# Altium PCB IoT_1062.PcbDoc (part 3 of 3)
Units mm, origin at the board's own origin, x right, y up, seen from the top; angles counter-clockwise.
Board outline 174.13 x 100.2 mm, 2 copper layers (Top Layer, Bottom Layer); 191 components, 138 nets, 1095 pads, 196 vias.
Unrouted connection lines stored in the file: 289.
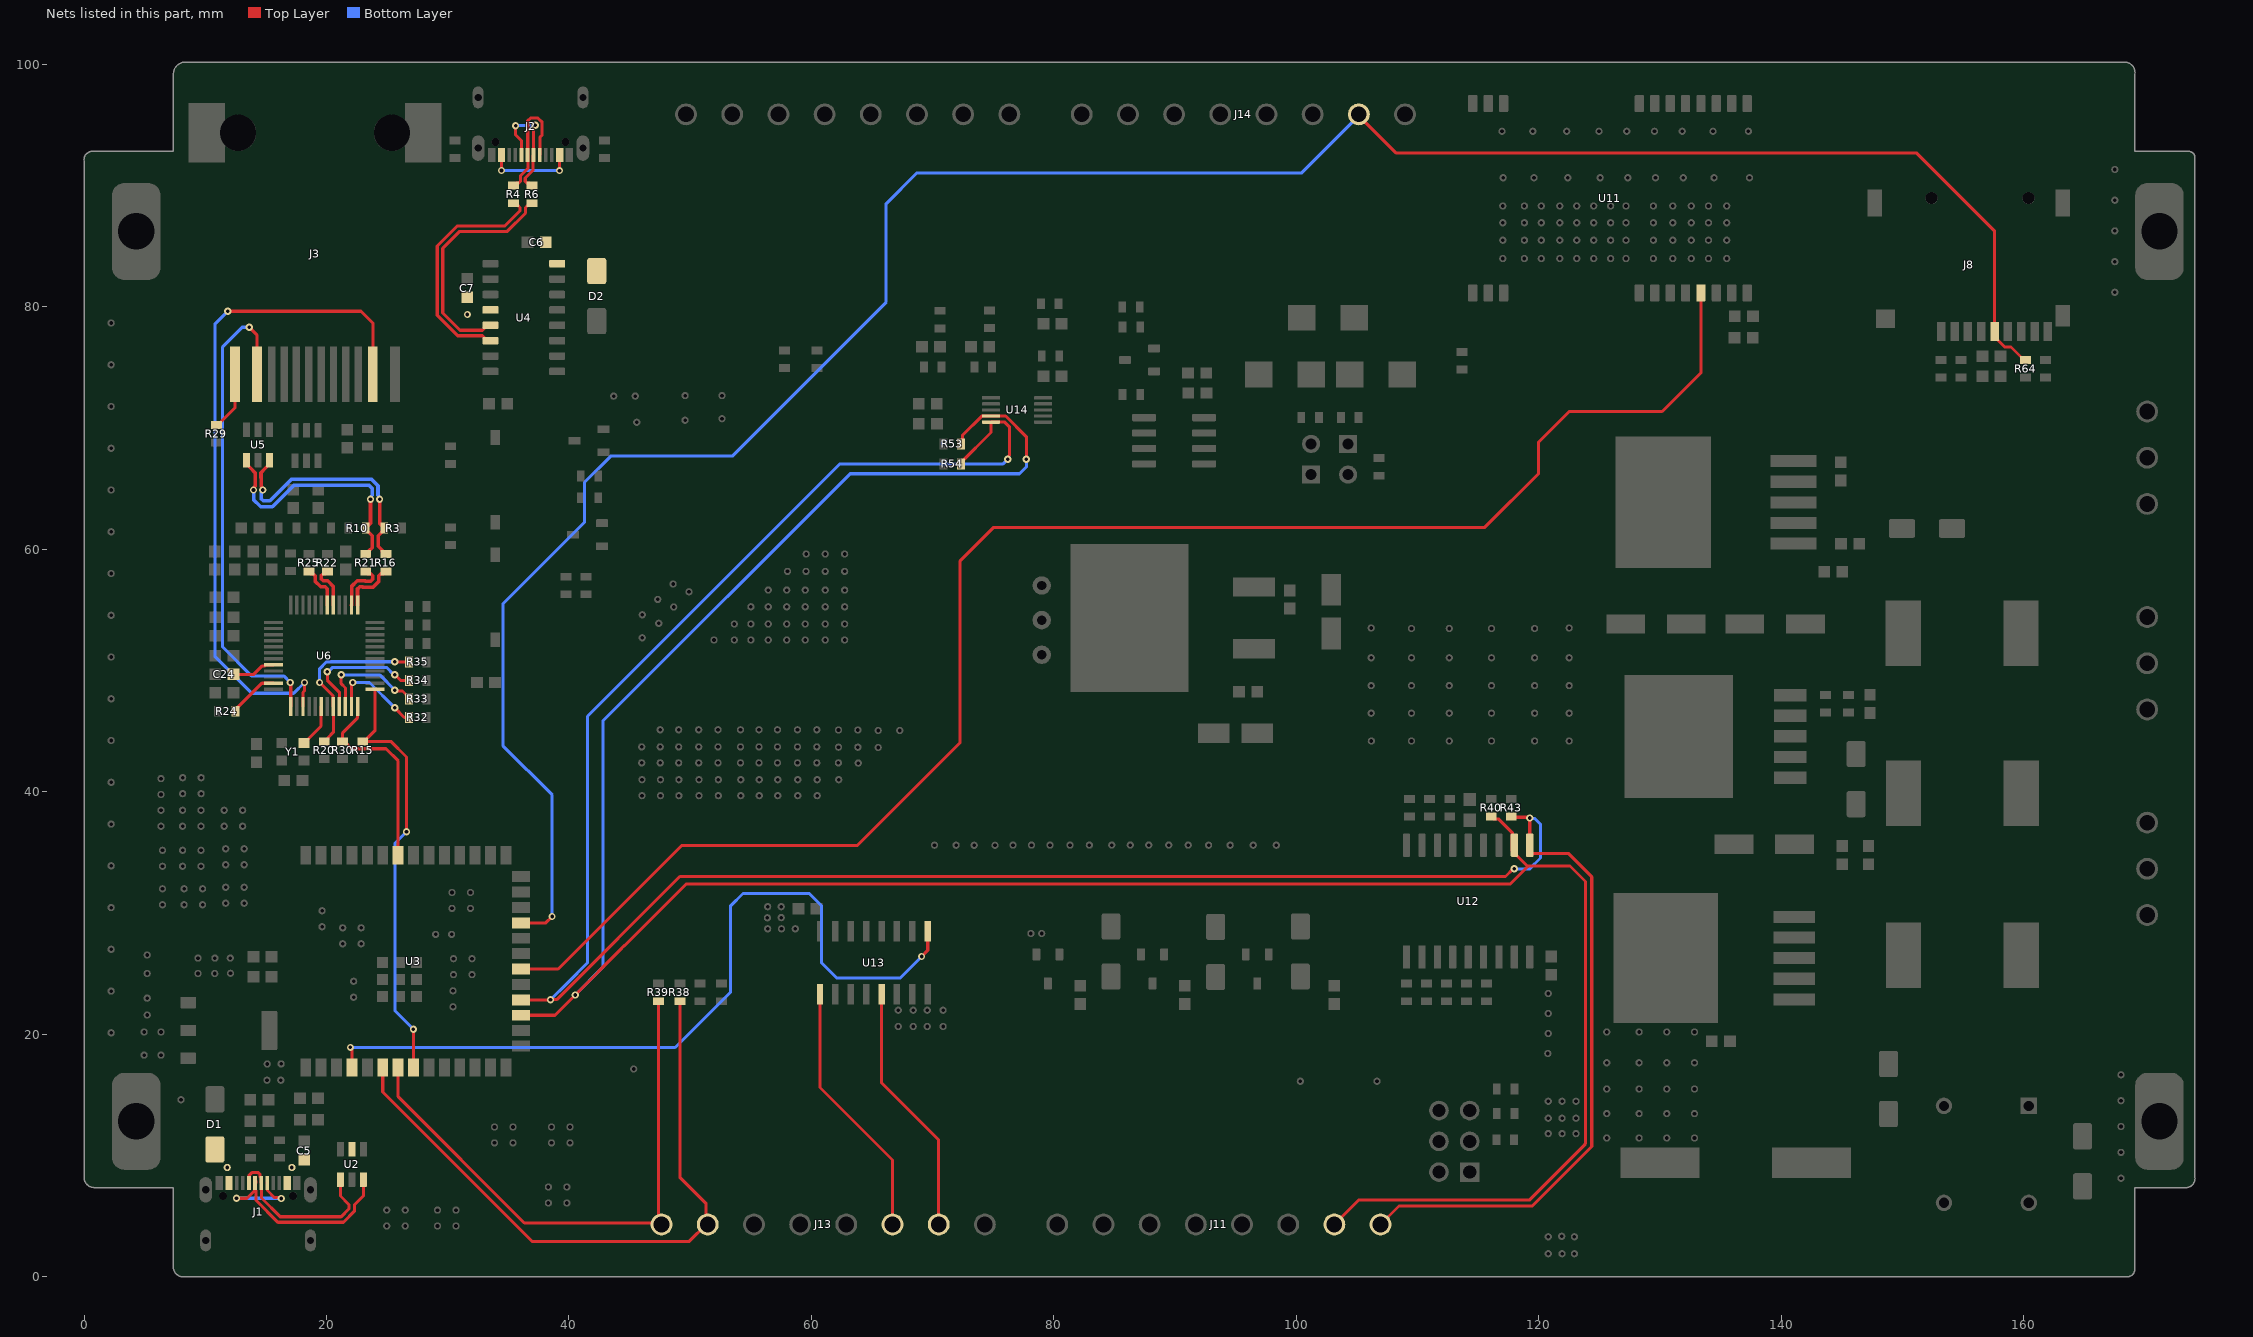
[diagram p3: the nets of this part, all layers, seen from the top]

## Via types
v1: diameter 0.6, hole 0.3, Top Layer to Bottom Layer, tented both sides, 195 vias
v2: diameter 1.524, hole 0.762, Top Layer to Bottom Layer, tented both sides, 1 vias

## Nets (pads, with @x,y where several pads share a name; then routed paths per layer and width w, separated by ;. In a path a pad name is that pad's centre, name@x,y a point inside that pad or via, vN(x,y) a via of type N, cw(c..) or ccw(c..) an arc to the next point about the centre after c; other vN are vias at no path point) (continued)
S1: U3.4 U13.9 | length 66.9
  Top Layer w0.254: v1(21.971,18.923) 21.971,18.829 22.098,18.702 U3.4@22.098,17.272 ; v1(69.088,26.416) 69.596,26.924 U13.9@69.596,28.499
  Bottom Layer w0.254: v1(21.971,18.923) 21.981,18.913 48.758,18.913 53.34,23.495 53.34,30.607 54.356,31.623 59.817,31.623 60.833,30.607 60.833,25.908 62.103,24.638 67.31,24.638 v1(69.088,26.416)
SCK_CD: J8.5 J14.7 R64.2 U3.23 | length 192.7
  Top Layer w0.254: U3.23@36.048,29.197 38.087,29.197 v1(38.608,29.718) ; J14.7@105.156,95.758 108.204,92.71 151.13,92.71 157.598,86.242 J8.5@157.598,77.975 157.598,77.525 158.426,76.697 158.943,76.697 160.022,75.618 R64.2@160.147,75.618
  Bottom Layer w0.254: v1(38.608,29.718) 38.608,39.751 34.544,43.815 34.544,55.499 41.275,62.23 41.275,65.532 43.434,67.691 53.467,67.691 66.167,80.391 66.167,88.519 68.707,91.059 100.457,91.059 J14.7@105.156,95.758
SCL1: J13.8 R39.1 U3.7 | length 46.7
  Top Layer w0.254: U3.7@25.908,17.272 25.908,14.859 36.322,4.445 J13.8@47.384,4.445 ; R39.1@47.371,22.733 47.371,4.458 J13.8@47.384,4.445 ; J13.8@47.511,4.318 J13.8@47.384,4.445
SCL2: J11.1 R43.1 R54.1 U3.18 U12.1 U14.10 | length 222.4
  Top Layer w0.254: U3.18@36.048,22.847 v1@38.468,22.847 ; v1(38.481,22.86) 38.989,22.86 49.149,33.02 117.254,33.02 117.889,33.655 v1(117.983,33.655) ; R54.1@72.353,67.056 72.353,67.181 74.812,69.64 U14.10@74.812,70.501 75.946,70.501 76.327,70.12 76.327,67.759 76.266,67.698 76.266,67.503 v1(76.2,67.437) ; J11.1@106.947,4.318 108.471,5.842 119.463,5.842 124.364,10.742 124.364,32.989 122.428,34.925 119.426,34.925 119.253,35.098 U12.1@119.253,35.598 v1(119.253,37.846) 119.189,37.91 117.792,37.91 R43.1@117.729,37.973
  Bottom Layer w0.254: v1(38.481,22.86) 39.848,24.227 41.529,25.908 41.529,46.228 62.357,67.056 75.819,67.056 v1(76.2,67.437) ; v1(117.983,33.655) 119.253,33.655 120.142,34.544 120.142,37.338 119.671,37.809 119.29,37.809 v1(119.253,37.846)
SDA1: J13.7 R38.1 U3.6 | length 53.7
  Top Layer w0.254: U3.6@24.638,17.272 24.638,15.24 36.957,2.921 49.924,2.921 51.321,4.318 51.321,6.038 49.149,8.21 R38.1@49.149,22.733
SDA2: J11.2 R40.1 R53.1 U3.17 U12.2 U14.9 | length 221.8
  Top Layer w0.254: U3.17@36.048,21.577 38.849,21.577 v1(40.513,23.241) 44.323,27.051 44.323,27.082 44.546,27.305 44.577,27.305 49.657,32.385 117.622,32.385 119.127,33.891 ; R53.1@72.353,68.707 72.448,68.802 72.448,69.389 74.047,70.988 74.799,70.988 U14.9@74.812,71.001 76.023,71.001 77.724,69.3 v1(77.724,67.437) ; J11.2@103.137,4.318 105.169,6.35 119.253,6.35 123.825,10.922 123.825,10.987 123.856,11.018 123.856,32.608 122.573,33.891 119.035,33.891 118.156,34.77 117.983,34.943 U12.2@117.983,35.598 ; R40.1@116.078,37.973 116.276,37.775 116.66,37.775 117.81,36.625 117.81,35.116 U12.2@117.929,34.997
  Bottom Layer w0.254: v1(40.513,23.241) 42.799,25.527 42.799,45.847 63.192,66.24 77.162,66.24 77.724,66.802 v1(77.724,67.437)
TOCAP: C24.1 U6.20 | length 3.6
  Top Layer w0.254: C24.1@12.319,49.698 14.011,49.698 14.706,50.393 14.913,50.393 14.992,50.472 U6.20@15.632,50.472
TX_LoRa: U3.20 U11.23 | length 134.6
  Top Layer w0.254: U3.20@36.048,25.387 39.103,25.387 49.276,35.56 63.754,35.56 72.263,44.069 72.263,59.055 75.03,61.822 115.543,61.822 119.98,66.259 119.98,68.858 122.497,71.374 130.175,71.374 133.374,74.573 U11.23@133.374,81.154
TX_N: R3.1 R16.2 U5.3 | length 20.4
  Top Layer w0.293: v1(14.732,64.897) 14.673,64.956 14.673,65.152 14.603,65.222 14.603,65.924 14.597,65.93 14.597,66.336 14.942,66.681 14.942,66.697 15.301,67.056 U5.3@15.301,67.366 ; v1(24.378,64.135) 24.378,62.15 R3.1@24.765,61.763 24.765,61.638 24.257,61.13 24.257,60.259 24.588,59.927 24.588,59.802 24.767,59.624 R16.2@24.892,59.624
  Bottom Layer w0.293: v1@14.603,64.685 14.603,64.182 14.775,64.011 15.335,64.011 17.095,65.771 23.719,65.771 24.249,65.241 24.249,64.46 24.319,64.39 24.319,64.194 v1(24.378,64.135)
TX_P: R10.1 R21.2 U5.1 | length 20.6
  Top Layer w0.293: U5.1@13.401,67.366 13.401,67.056 13.76,66.697 13.76,66.681 14.105,66.336 14.105,65.726 14.111,65.72 14.111,65.222 14.041,65.152 14.041,64.956 v1(13.982,64.897) ; R21.2@23.241,59.624 23.366,59.624 23.545,59.802 23.545,59.927 23.764,60.147 23.764,61.115 23.241,61.638 R10.1@23.241,61.763 23.628,62.15 v1(23.628,64.135)
  Bottom Layer w0.293: v1(13.982,64.897) 13.982,64.107 14.571,63.518 15.539,63.518 17.299,65.278 23.515,65.278 23.757,65.037 23.757,64.46 23.687,64.39 23.687,64.194 v1(23.628,64.135)
TXD_1: J13.3 U13.1 | length 21.5
  Top Layer w0.254: U13.1@60.706,23.317 60.706,15.621 66.688,9.639 J13.3@66.688,4.318
TXD_2: J13.2 U13.5 | length 21.1
  Top Layer w0.254: U13.5@65.786,23.317 65.786,16.002 70.498,11.29 J13.2@70.498,4.318 ; J13.2@70.371,4.318 J13.2@70.371,4.488
UD_N: R4.2 U4.6 | length 20
  Top Layer w0.254: U4.6@33.528,77.216 33.183,77.216 33,77.399 33,77.475 32.851,77.624 30.827,77.624 29.137,79.314 29.137,85.024 30.8,86.687 34.731,86.687 35.968,87.924 35.968,88.209 35.819,88.358 35.631,88.358 R4.2@35.433,88.556
UD_P: R6.2 U4.5 | length 19.3
  Top Layer w0.254: U4.5@33.528,78.486 33.183,78.486 33,78.303 33,78.227 32.851,78.078 31.015,78.078 29.591,79.502 29.591,84.836 30.988,86.233 34.919,86.233 36.422,87.736 36.422,88.209 36.571,88.358 36.759,88.358 R6.2@36.957,88.556
USB1_N: J1.A7 J1.B7 U2.1 | length 14.5
  Top Layer w0.254: J1.B7@13.605,7.747 13.628,7.77 13.628,8.382 13.84,8.594 14.37,8.594 14.532,8.432 14.532,8.24 14.605,8.167 J1.A7@14.605,7.747 14.632,7.72 14.632,7.112 14.632,6.501 16.18,4.953 21.209,4.953 21.844,5.588 21.844,5.968 21.148,6.664 U2.1@21.148,8.016
USB1_P: J1.A6 J1.B6 U2.3 | length 21.3
  Top Layer w0.254: v1(12.573,6.477) 13.447,6.477 14.082,7.112 14.082,7.724 J1.A6@14.105,7.747 ; 14.178,7.112 14.178,6.313 15.992,4.499 21.397,4.499 22.298,5.4 22.298,5.927 23.048,6.677 U2.3@23.048,8.016 ; J1.A6@14.178,7.724 J1.A6@14.178,7.88 ; J1.B6@15.105,7.747 15.128,7.724 15.128,7.112 15.712,6.528 16.207,6.528 v1(16.273,6.462)
  Bottom Layer w0.254: v1(12.573,6.477) 16.258,6.477 v1(16.273,6.462)
USB_N: J2.A7 J2.B7 R4.1 | length 10.2
  Top Layer w0.254: R4.1@35.433,90.006 35.631,90.204 35.844,90.204 35.993,90.353 35.993,90.802 36.628,91.437 36.628,92.018 36.603,92.043 36.603,92.509 J2.A7@36.58,92.532 ; J2.A7@36.603,92.528 36.603,95.355 36.821,95.573 37.45,95.573 37.788,95.235 37.788,94.176 37.603,93.991 37.603,92.555 J2.B7@37.58,92.532
USB_P: J2.A6 J2.B6 R6.1 | length 9.9
  Top Layer w0.254: v1(35.597,94.951) 35.597,94.197 36.068,93.726 36.068,92.544 J2.B6@36.08,92.532 ; R6.1@36.957,90.006 36.759,90.204 36.546,90.204 36.397,90.353 36.397,90.634 37.032,91.269 37.032,92.018 37.057,92.043 37.057,92.509 J2.A6@37.08,92.532 37.08,94.771 37.211,94.902 v1(37.211,94.996)
  Bottom Layer w0.254: v1(35.597,94.951) 35.619,94.973 37.188,94.973 v1(37.211,94.996)
VBUS_1: C5.2 D1.A J1.A4_B9 J1.B4_A9 pad.6@11.811,9.017 pad.6@17.145,9.017 U2.5
VBUS_2: C6.2 C7.2 D2.A J2.A4_B9 J2.B4_A9 U4.4 U4.16 | length 7.4
  Top Layer w0.254: v1(34.431,91.254) J2.B4_A9@34.43,92.532 ; v1(39.225,91.246) 39.227,91.248 39.227,92.529 J2.A4_B9@39.23,92.532
  Bottom Layer w0.254: v1(34.431,91.254) 39.216,91.254 v1(39.225,91.246)
  other v1: 31.623,79.375
W5500_25MHz: U6.30 Y1.3 | length 3.6
  Top Layer w0.254: Y1.3@18.161,44.033 18.211,44.033 18.484,44.306 18.484,44.356 18.616,44.488 19.549,45.421 19.549,47.029 U6.30@19.562,47.042
W5500_ACTn: J3.P11 U6.27 | length 56.5
  Top Layer w0.254: v1(11.856,79.645) 22.844,79.645 23.82,78.669 J3.P11@23.82,74.441 ; U6.27@18.062,47.042 18.062,48.214 18.18,48.332 v1(18.18,49.022)
  Bottom Layer w0.254: v1(11.856,79.645) 10.795,78.584 10.795,51.181 13.843,48.133 17.291,48.133 v1(18.18,49.022)
W5500_CLK: R34.2 U6.33 | length 10.6
  Top Layer w0.254: v1(20.066,49.911) 20.066,49.215 21.062,48.219 U6.33@21.062,47.042 ; v1@25.654,49.657 26.121,49.19 R34.2@26.797,49.19
  Bottom Layer w0.254: v1(20.066,49.911) 20.16,49.911 20.519,50.27 24.947,50.27 25.56,49.657 v1@25.654,49.657
  other v1: 25.621,49.657
W5500_CS: R20.2 R35.2 U6.32 | length 14.5
  Top Layer w0.254: v1(19.431,49.022) 20.549,47.904 20.549,47.055 U6.32@20.562,47.042 20.562,44.913 20.135,44.486 20.135,44.361 19.937,44.163 R20.2@19.812,44.163 ; v1(25.621,50.735) 25.642,50.714 R35.2@26.797,50.714
  Bottom Layer w0.254: v1(19.431,49.022) 19.431,50.165 20.001,50.735 v1(25.621,50.735)
W5500_INTn: R30.1 U3.34 U6.36 | length 16.4
  Top Layer w0.254: U6.36@22.562,47.042 22.549,47.029 22.549,46.082 21.336,44.869 R30.1@21.336,44.163 21.461,44.163 22.067,43.557 24.912,43.557 25.908,42.561 U3.34@25.908,34.772
W5500_LINKn: J3.P2 U6.25 | length 40.6
  Top Layer w0.254: v1(13.618,78.323) 14.28,77.661 J3.P2@14.28,74.441 ; v1(17.018,49.022) 17.049,48.991 17.049,47.055 U6.25@17.062,47.042
  Bottom Layer w0.254: v1(13.618,78.323) 13.045,78.323 11.43,76.708 11.43,51.943 13.799,49.574 16.466,49.574 v1(17.018,49.022)
W5500_MISO: R33.2 U6.34 | length 9.2
  Top Layer w0.254: v1(21.209,49.657) 21.209,48.924 21.562,48.571 U6.34@21.562,47.042 ; v1@25.654,48.387 25.72,48.321 26.267,48.321 26.797,47.791 R33.2@26.797,47.666
  Bottom Layer w0.254: v1(21.209,49.657) 24.384,49.657 v1@25.654,48.387
  other v1: 25.621,48.387
W5500_MOSI: R32.2 U6.35 | length 7.8
  Top Layer w0.254: U6.35@22.062,47.042 22.062,48.818 22.169,48.924 v1(22.169,49.018) ; v1@25.629,46.934 26.422,46.142 R32.2@26.797,46.142
  Bottom Layer w0.254: v1(22.169,49.018) 23.546,49.018 v1@25.629,46.934
  other v1: 25.621,46.934
W5500_RST: R15.2 U3.8 U6.37 | length 35.4
  Top Layer w0.254: R15.2@22.987,44.163 R15.2@23.112,44.163 ; U6.37@23.992,48.472 23.992,45.043 R15.2@23.112,44.163 ; v1(26.597,36.703) 26.597,42.872 25.306,44.163 R15.2@23.112,44.163 ; v1(27.17,20.428) 27.178,20.42 U3.8@27.178,17.272
  Bottom Layer w0.254: v1(26.597,36.703) 25.654,35.76 25.654,21.944 v1(27.17,20.428)
W5500_RSVD: R24.1 U6.23 | length 4.2
  Top Layer w0.254: R24.1@12.479,46.65 12.479,46.775 14.663,48.959 15.619,48.959 U6.23@15.632,48.972
W_RX_N: R22.1 U6.5 | length 3.7
  Top Layer w0.293: R22.1@20.066,58.174 19.887,57.995 19.73,57.995 19.55,57.816 19.55,57.573 19.722,57.402 20.098,57.402 20.558,56.942 20.558,55.406 U6.5@20.562,55.402
W_RX_P: R25.1 U6.6 | length 3.7
  Top Layer w0.293: R25.1@18.542,58.174 18.721,57.995 18.886,57.995 19.058,57.823 19.058,57.369 19.518,56.909 19.894,56.909 20.066,56.737 20.066,55.406 U6.6@20.062,55.402
W_TX_N: R16.1 U6.1 | length 4.6
  Top Layer w0.293: U6.1@22.562,55.402 22.558,55.406 22.558,56.738 22.73,56.909 22.983,56.909 22.998,56.894 23.853,56.894 24.313,57.355 24.313,57.823 24.484,57.995 24.713,57.995 R16.1@24.892,58.174
W_TX_P: R21.1 U6.2 | length 4.6
  Top Layer w0.293: U6.2@22.062,55.402 22.066,55.406 22.066,56.942 22.526,57.402 23.187,57.402 23.202,57.387 23.649,57.387 23.82,57.559 23.82,57.823 23.649,57.995 23.42,57.995 R21.1@23.241,58.174
YELL: J3.P1 R29.1 | length 4.9
  Top Layer w0.254: R29.1@10.922,70.272 11.047,70.272 12.44,71.665 J3.P1@12.44,74.441
pads on no net: J1. J1.A8 J1.B8 J2. J2.A8 J2.B8 J3. J3.P9 J8. J8.1 J8.8 J8.CD U4.7 U4.8 U4.9 U4.10 U4.11 U4.12 U4.15 U5.5 U6.7 U6.12 U6.13 U6.18 U6.24 U6.26 U6.31 U6.38 U6.39 U6.40 U6.41 U6.42 U6.46 U6.47 U7.5 U11.1 U11.3 U11.4 U11.5 U11.6 U11.7 U11.12 U12.7 U13.2 U13.4 U13.11 U13.15 U14.2

## Polygon pours and split planes (outlines as drawn)
GND on Bottom Layer "NONET_L-01_P-001" (solid, remove dead copper, pour order 1): 0,100.33 174.244,100.33 174.244,0 0,0
GND on Top Layer "NONET_L-01_P-001" (solid, remove dead copper, pour order 2): 0,100.33 174.117,100.33 174.117,0 0,0

## Keep-outs
Keep-Out Layer:
  lines w0.254: 0,8.128 ccw(c0.826,8.191) 0.889,7.366 7.366,7.366 7.366,0.889 ccw(c8.191,0.826) 8.128,0 168.529,0 ccw(c168.529,0.635) 169.164,0.635 169.164,7.366 173.482,7.366 ccw(c173.355,8.128) 174.117,8.255 174.117,92.329 ccw(c173.609,92.329) 173.609,92.837 169.181,92.837 169.173,92.846 169.173,99.23 ccw(c168.284,99.314) 168.367,100.203 8.38,100.203 ccw(c8.381,99.188) 7.366,99.187 7.366,92.837 0.635,92.837 ccw(c0.699,92.138) 0,92.075 0,8.128

## Other copper
Top Layer:
  region net +3V3: 52.324,97.155 52.324,79.248 55.245,79.248 55.245,97.155
  region net +3V3: 64.135,2.413 64.135,6.223 62.484,6.223 59.182,9.525 59.182,25.654 57.531,25.654 57.531,9.271 61.468,5.334 61.468,2.413
  region net GND: 124.968,69.977 156.464,69.977 156.464,66.675 134.366,66.675 134.366,58.42 124.968,58.42
  region net "IN +": 172.085,58.039 165.1,58.039 165.1,40.386 172.085,40.386 172.085,49.022 168.367,49.022 168.367,52.197 172.085,52.197
  region net "IN +": 162.179,10.033 162.179,31.496 166.37,31.496 166.37,10.033
  region net +12: 172.212,36.195 156.083,36.195 156.083,34.544 146.05,34.544 146.05,32.766 162.052,32.766 162.052,31.75 172.212,31.75
  region net +9: 172.085,65.024 162.052,65.024 162.052,48.895 147.828,48.895 147.828,58.888 144.284,58.888 144.284,57.035 144.272,57.023 138.938,57.023 138.938,49.149 144.526,49.149 144.526,47.371 148.717,47.371 148.717,44.958 155.575,44.958 155.575,36.576 164.719,36.576 164.719,58.293 172.085,58.293
  region net +5: 172.085,69.342 157.607,69.342 157.607,62.992 161.671,62.992 161.671,65.278 172.085,65.278
  region net GND: 91.948,55.626 98.679,55.626 101.727,55.626 101.727,54.737 124.587,54.737 124.587,51.816 129.413,51.816 129.413,42.926 94.996,42.926 94.996,46.863 96.266,46.863 96.266,49.53 91.948,49.53
  region net GND: 124.841,51.816 129.667,51.816 129.667,55.245 137.668,55.245 137.668,64.516 157.099,64.516 157.099,49.149 152.4,49.149 152.4,63.246 147.955,63.246 138.43,63.246 138.43,59.436 145.923,59.436 145.923,61.214 147.955,61.214 147.955,59.182 144.067,59.182 144.067,57.404 138.684,57.404 138.684,49.911 124.841,49.911
  region net NetD5_C: 152.146,49.149 148.209,49.149 148.209,61.468 138.684,61.468 138.684,62.992 152.146,62.992
  region net +3V3: 30.861,67.945 30.861,75.438 29.464,75.438 29.464,67.945
  region net +3V3: 22.86,68.961 30.861,68.961 30.861,67.945 22.86,67.945
  region net VBUS_2: 30.988,81.407 30.988,78.867 32.369,78.867 32.877,79.375 34.29,79.375 34.29,80.264 32.766,80.264 32.385,80.645 32.385,81.407
  region net GND: 124.968,69.977 124.968,58.42 134.366,58.42 134.366,69.977
  region net +3V3: 53.467,75.438 61.163,75.438 61.163,74.295 53.467,74.295
  region net +12: 138.865,41.91 143.637,41.91 143.637,34.544 155.194,34.544 155.194,23.495 148.463,23.495 148.463,27.432 139.319,27.432 139.319,28.575 143.637,28.575 143.637,33.02 138.865,33.02
  region net +3V3: 112.395,75.438 112.395,71.882 104.648,71.882 104.648,70.231 114.173,70.231 114.808,70.866 114.808,75.438
  region net VBUS_2: 34.163,93.091 34.671,93.091 34.671,91.948 34.798,91.821 34.798,90.805 34.036,90.805 34.036,91.821 34.163,91.948
  region net +5: 103.632,22.987 103.632,20.701 101.854,20.701 101.854,22.987
  region net +5: 89.916,22.987 91.694,22.987 91.694,20.701 89.916,20.701
  region net +5: 81.28,22.987 82.931,22.987 82.931,20.701 81.28,20.701
  region net +5: 83.058,27.686 104.902,27.686 104.902,30.226 83.058,30.226
  region net GND: 77.47,28.702 79.502,28.702 79.502,25.654 77.47,25.654
  region net +5: 71.755,64.262 64.77,64.262 64.77,82.296 61.849,82.296 61.849,84.074 66.421,84.074 66.421,67.691 71.755,67.691
  region net +3V3: 112.395,75.438 130.683,75.438 130.683,73.406 112.395,73.406
  region net +3V3: 91.313,71.882 96.774,71.882 96.774,70.358 91.313,70.358
  region net +5: 41.275,80.01 46.101,80.01 46.101,77.597 41.275,77.597
  region net +5: 69.723,70.612 69.723,66.167 71.755,66.167 71.755,70.612
  region net +3V3: 86.741,78.994 86.741,77.597 89.027,77.597 89.027,76.327 91.948,76.327 91.948,74.93 93.472,74.93 93.472,78.994 89.789,78.994
  region net +3V3: 91.313,70.358 91.313,71.882 91.948,71.882 91.948,75.311 93.472,75.311 93.472,70.358
  region net +5: 135.382,81.915 136.398,81.915 136.398,80.137 136.779,79.756 136.779,70.739 135.382,70.739
  region net +3V3: 155.956,78.867 156.972,78.867 156.972,76.708 157.226,76.708 157.226,72.263 159.512,72.263 159.512,74.803 162.687,74.803 162.687,70.866 150.368,70.866 150.368,74.549 155.956,74.549
  region net +5: 75.565,71.628 73.66,71.628 72.644,72.644 69.723,72.644 69.723,69.596 71.755,69.596 73.66,71.374 75.565,71.374
  region net +3V3: 46.101,26.924 46.101,16.256 44.704,16.256 44.704,26.924
  region net +3V3: 59.69,29.083 59.69,26.924 44.958,26.924 44.958,23.749 59.182,23.749 59.182,24.892 61.468,24.892 61.468,29.083
  region net VBUS_2: 38.989,93.091 39.497,93.091 39.497,85.344 38.735,85.344 38.989,85.598
  region net VBUS_2: 37.592,91.694 37.592,83.185 40.005,83.185 41.402,81.788 43.561,81.788 43.561,91.694
  region net +3V3: 27.686,55.372 27.686,62.484 28.829,62.484 28.829,55.372
  region net +3V3: 24.511,68.961 26.797,68.961 26.797,62.738 25.781,62.738 25.781,67.945 24.511,67.945
  region net +3V3: 30.861,62.484 30.861,61.214 25.781,61.214 25.781,62.357 25.908,62.484
  region net +3V3: 11.811,69.342 11.811,67.945 7.366,67.945 7.366,59.055 11.43,59.055 11.43,55.499 7.366,55.499 7.366,45.085 15.113,45.085 15.113,43.18 14.986,43.307 5.715,43.307 5.715,69.342
  region net +3V3: 26.797,61.214 25.781,61.214 25.781,63.5 26.797,63.5
  region net +3V3: 22.225,61.087 21.209,61.087 21.209,63.5 22.225,63.5
  region net +3.3A: 11.684,50.673 11.684,59.055 16.256,59.055 16.256,57.404 17.399,57.404 17.399,56.388 14.605,56.388 14.605,50.673
  region net +3.3A: 16.383,52.07 16.383,51.816 13.462,51.816 13.462,52.07
  region net +3.3A: 16.383,52.832 13.589,52.832 13.589,53.086 16.383,53.086
  region net +3.3A: 17.653,54.61 17.399,54.61 17.399,57.404 17.653,57.15
  region net +3.3A: 22.098,58.928 22.098,57.404 21.209,56.515 21.209,54.737 20.955,54.737 20.955,58.928
  region net +3V3: 27.686,56.007 28.829,56.007 28.829,52.959 30.988,52.959 30.988,51.435 27.686,51.435
  region net +3V3: 18.415,47.752 18.669,47.752 18.669,45.085 18.288,44.704 17.145,44.704 17.145,43.688 13.462,43.688 13.462,45.974 18.415,45.974
  region net +3V3: 17.145,41.91 17.145,38.862 19.304,38.862 19.304,43.18 24.892,43.18 24.892,41.783 20.447,41.783 20.447,37.846 15.494,37.846 15.494,41.91
  region net +3V3: 13.462,44.704 17.145,44.704 17.145,41.91 17.145,40.259 15.494,40.259 15.494,43.18 13.462,43.18
  region net GND: 6.477,21.59 13.716,21.59 13.716,23.749 14.478,23.749 14.478,27.051 6.477,27.051
  region net GND: 144.145,40.386 148.082,40.386 148.082,36.195 155.194,36.195 155.194,34.925 144.145,34.925
  region net GND: 120.269,25.409 120.269,11.176 123.475,11.176 123.475,25.409
  region net +3V3: 107.442,17.272 99.441,17.272 99.441,15.24 107.442,15.24
  region net VBUS_1: 9.906,11.684 12.192,11.684 12.192,7.239 11.684,7.239 11.684,8.424 11.049,9.271 9.906,9.271
  region net GND: 18.796,18.161 18.796,16.256 18.415,16.256 18.415,11.938 18.796,11.938 18.796,10.668 13.081,10.668 13.081,11.938 14.605,11.938 14.605,18.161
  region net VBUS_1: 21.717,11.176 21.717,9.652 18.923,9.652 18.923,10.287 16.764,10.287 16.764,8.509 16.51,8.255 16.51,7.239 17.018,7.239 17.018,8.382 17.78,9.144 22.479,9.144 22.479,11.176
  region net GND: 59.436,30.988 59.436,28.067 55.88,28.067 55.88,30.988
  region net GND: 66.548,20.066 71.882,20.066 71.882,24.511 66.548,24.511
  region net +5: 14.351,12.192 7.112,12.192 7.112,19.05 13.716,19.05 13.716,15.367 14.351,15.367
  region net +3.3: 14.732,27.178 14.732,22.479 14.224,22.479 14.224,18.415 19.05,18.415 19.05,16.002 18.669,16.002 18.669,12.192 20.32,12.192 20.32,16.002 20.066,16.002 20.066,19.431 16.891,19.431 16.891,27.178
  region net GND: 109.601,36.703 109.601,34.417 113.665,34.417 113.665,35.306 117.221,35.306 117.221,33.528 108.204,33.528 108.204,36.703
  region net GND: 108.204,36.703 109.601,36.703 109.601,34.417 113.665,34.417 113.665,38.354 114.935,38.354 114.935,36.83 117.094,36.83 117.221,36.703 117.221,34.417 108.204,34.417
  region net +3V3: 109.093,23.114 107.569,23.114 107.569,29.21 106.045,29.21 106.045,22.225 109.093,22.225
  region net +3V3: 94.615,45.021 94.615,42.545 110.363,42.545 110.363,38.989 76.581,38.989 76.581,45.021
  region net +3V3: 59.69,27.559 61.468,27.559 61.468,31.242 59.69,31.242
  region net +3V3: 108.458,23.114 111.252,23.114 111.252,22.225 108.458,22.225
  region net +3V3: 118.872,28.956 123.317,28.956 123.317,25.666 120.015,25.666 120.015,25.273 118.872,25.273
  region net +3V3: 108.712,42.545 124.46,42.545 124.46,38.989 115.062,38.989 115.062,40.259 113.284,40.259 113.284,38.989 108.712,38.989
  region net +3V3: 76.581,60.706 91.44,60.706 91.44,49.276 95.885,49.276 95.885,47.117 94.615,47.117 94.615,42.926 76.581,42.926
  region net +5: 125.984,58.166 102.235,58.166 102.235,55.118 125.984,55.118
  region net +5: 124.46,55.118 124.46,60.706 91.948,60.706 91.948,55.88 101.981,55.88 101.981,55.118
  region net GND: 139.065,26.289 139.065,23.876 134.112,23.876 134.112,26.289
  region net GND: 124.841,50.864 124.841,0.635 134.874,0.635 134.874,25.654 147.828,25.654 147.828,26.924 147.701,26.924 138.811,26.924 138.811,29.083 142.875,29.083 142.875,32.512 138.557,32.512 138.557,44.069 142.494,44.069 142.494,45.212 138.557,45.212 138.557,50.864
  region net GND: 144.145,48.895 138.684,48.895 138.684,50.419 136.271,50.419 136.271,47.371 144.145,47.371
  region net +5: 144.399,64.77 157.353,64.77 157.353,49.149 161.671,49.149 161.671,66.294 144.399,66.294
  region net +5: 145.796,66.294 135.001,66.294 135.001,58.166 124.841,58.166 124.841,52.07 129.413,52.07 129.413,55.499 137.287,55.499 137.287,64.77 145.796,64.77
  region net +12: 138.684,61.214 145.669,61.214 145.669,59.69 138.684,59.69
  region net NetC41_1: 138.811,46.99 138.811,47.117 148.336,47.117 148.336,44.958 142.748,44.958 142.748,45.466 138.811,45.466
  region net NetD6_C: 144.018,43.561 144.018,40.767 148.844,40.767 148.844,43.561
  region net NetD6_C: 148.336,36.576 155.194,36.576 155.194,44.704 142.748,44.704 142.748,43.688 138.811,43.688 138.811,42.164 148.336,42.164
  region net +24: 157.099,9.271 157.099,2.794 135.255,2.794 135.255,17.399 135.255,23.622 144.018,23.622 144.018,15.875 147.066,15.875 147.066,9.271
  region net NetD4_C: 139.319,25.273 147.828,25.273 147.828,19.685 144.526,19.685 144.526,23.876 139.319,23.876
  region net GND: 147.574,15.875 159.258,15.875 159.258,10.16 157.099,10.16 157.099,9.652 156.083,9.652 147.574,9.652
  region net NetD4_C: 161.544,32.512 161.544,16.129 150.241,16.129 144.526,16.129 144.526,23.114 155.829,23.114 155.829,32.512
  region net NetD3_C: 166.37,9.779 166.37,2.794 157.353,2.794 157.353,9.779
  text "VIETTIEN" at 53.187,68.153 h1.3
Bottom Layer:
  region net +3V3: 55.245,74.295 50.673,74.295 50.673,81.534 55.245,81.534
  region net +5: 56.134,97.155 56.134,82.296 58.547,82.296 58.547,97.155
  region net +24: 171.958,40.767 162.052,40.767 162.052,31.877 165.354,31.877 165.354,28.575 157.099,28.575 157.099,21.717 163.322,21.717 163.322,11.938 151.384,11.938 151.384,2.667 158.242,2.667 158.242,7.366 166.116,7.366 166.116,18.542 167.513,18.542 167.513,35.052 171.958,35.052
  region net "IN +": 167.64,48.387 171.958,48.387 171.958,41.275 167.64,41.275
  region net "IN -": 162.56,12.573 155.321,12.573 155.321,17.145 153.543,17.145 153.543,48.895 163.83,48.895 163.83,52.324 171.958,52.324 171.958,48.895 167.132,48.895 167.132,45.339 156.591,45.339 156.591,21.082 162.56,21.082
  region net "IN +": 165.1,28.829 157.226,28.829 157.226,45.085 171.958,45.085 171.958,41.275 161.544,41.275 161.544,31.496 165.1,31.496
  region net GND: 109.601,15.082 112.776,15.082 112.776,5.715 131.953,5.715 131.953,0.635 109.601,0.635
  region net VBUS_2: 30.988,78.867 30.988,81.407 38.481,81.407 38.481,91.694 39.751,91.694 39.751,80.391 32.893,80.391 32.893,78.867
  region net GND: 105.537,57.785 105.537,30.607 116.586,30.607 116.586,42.672 141.097,42.672 141.097,57.785
  region net GND: 155.067,12.446 155.067,16.764 153.289,16.764 153.289,38.227 124.841,38.227 124.841,0.635 150.622,0.635 150.622,12.446
  region net +3V3: 94.869,71.882 110.363,71.882 110.363,70.231 94.869,70.231
  region net +5: 81.28,20.701 104.902,20.701 104.902,22.225 81.28,22.225
  region net GND: 69.723,47.117 101.981,47.117 101.981,22.86 69.723,22.86
  region net +5: 64.77,65.659 64.77,48.26 104.902,48.26 104.902,49.911 67.31,49.911 67.31,65.659
  region net +5: 44.196,77.597 44.196,84.074 63.754,84.074 63.754,82.296 46.101,82.296 46.101,77.597
  region net +5: 124.46,58.42 120.523,58.42 120.523,72.39 136.779,72.39 136.779,70.739 124.46,70.739
  region net +3V3: 129.159,75.438 147.066,75.438 147.066,74.549 152.4,74.549 152.4,73.406 129.159,73.406
  region net +3V3: 94.869,71.882 96.774,71.882 96.774,61.976 80.264,61.976 80.264,50.292 77.978,50.292 77.978,63.373 94.869,63.373
  region net +3V3: 29.464,75.438 55.245,75.438 55.245,74.295 29.464,74.295
  region net +3V3: 19.304,16.256 19.304,22.606 17.526,24.384 17.526,38.862 15.494,38.862 15.494,23.749 17.272,21.971 17.272,16.256
  region net +3V3: 51.054,18.288 51.054,15.24 53.848,15.24 53.848,18.288
  region net +3V3: 53.848,18.288 17.272,18.288 17.272,16.256 53.848,16.256
  region net VBUS_2: 34.036,91.694 39.624,91.694 39.624,90.805 34.036,90.805
  region net +3V3: 26.67,62.738 21.209,62.738 21.209,63.5 26.67,63.5
  region net +3V3: 23.622,43.18 27.178,43.18 27.178,52.705 30.988,52.705 30.988,51.435 28.575,51.435 28.575,41.783 23.622,41.783
  region net GND: 120.269,14.859 123.444,14.859 123.444,0.635 120.269,0.635
  region net +3V3: 101.6,17.272 51.435,17.272 51.435,15.24 101.6,15.24
  region net +3V3: 122.555,15.24 106.045,15.24 106.045,17.272 122.555,17.272
  region net +3V3: 121.412,29.337 123.317,29.337 123.317,15.24 121.412,15.24
  region net GND: 69.723,27.305 76.835,27.305 76.835,28.067 80.645,28.067 80.645,17.907 69.723,17.907
  region net +5: 102.87,29.083 102.87,9.779 22.606,9.779 22.606,8.763 104.775,8.763 104.902,8.89 104.902,29.083
  region net +5: 18.796,15.24 18.796,8.763 23.749,8.763 23.749,9.779 20.32,9.779 20.32,15.24
  region net +5: 7.112,15.24 20.32,15.24 20.32,13.462 7.112,13.462
  region net VBUS_1: 11.43,9.398 11.43,8.509 17.653,8.509 17.653,9.398
  region net GND: 55.88,30.988 55.88,17.907 71.882,17.907 71.882,22.479 59.436,22.479 59.436,30.988
  region net +5: 102.87,26.67 102.87,60.706 124.333,60.706 124.333,58.42 104.902,58.42 104.902,26.67
  region net +3V3: 122.555,27.432 106.172,27.432 106.172,29.337 122.555,29.337
  region net +3V3: 123.317,41.148 123.317,27.432 120.713,27.432 120.713,41.148
  region net +12: 142.875,61.214 145.669,61.214 145.669,59.69 142.875,59.69
  region net +12: 143.764,61.214 143.764,38.989 141.986,38.989 141.986,61.214

## Silkscreen, mask and mechanical layers (free items; w line width, h text height)
Top Overlay:
  lines w0.254: 44.914,10.151 44.914,16.882 cw(c45.613,16.818) 45.676,17.517 46.727,17.517 ; 51.063,17.517 52.368,17.517 cw(c52.431,16.818) 53.13,16.882 53.13,10.151 ; 53.677,10.151 53.677,16.882 cw(c54.376,16.818) 54.439,17.517 ; 59.563,91.186 59.563,84.455 ccw(c60.261,84.519) 60.325,83.82 61.468,83.82 ; 59.988,17.517 cw(c60.051,16.818) 60.75,16.882 60.75,10.151 ; 64.853,10.151 64.853,16.882 cw(c65.552,16.818) 65.615,17.517 70.476,17.517 ; 65.024,83.82 66.056,83.82 ccw(c66.119,84.519) 66.818,84.455 66.818,91.186 ; 70.596,91.313 70.596,84.582 ccw(c71.295,84.645) 71.358,83.947 76.581,83.947 ; 76.284,17.569 80.636,17.569 cw(c80.7,16.871) 81.398,16.934 81.398,10.203 ; 81.788,83.947 87.011,83.947 ccw(c87.074,84.645) 87.773,84.582 87.773,91.313 ; 81.998,10.151 81.998,16.882 cw(c82.697,16.818) 82.76,17.517 83.557,17.517 ; 87.893,17.517 88.565,17.517 cw(c88.629,16.818) 89.327,16.882 89.327,10.151 ; 88.503,91.313 88.503,84.582 ccw(c89.202,84.645) 89.265,83.947 ; 89.999,10.151 89.999,16.882 cw(c90.698,16.818) 90.761,17.517 92.955,17.517 ; 94.885,83.947 ccw(c94.948,84.645) 95.647,84.582 95.647,91.313 ; 96.504,91.313 96.504,84.582 ccw(c97.203,84.645) 97.266,83.947 101.727,83.947 ; 98.434,17.517 100.017,17.517 cw(c100.081,16.818) 100.779,16.882 100.779,10.151 ; 101.429,10.151 101.429,16.882 cw(c102.128,16.818) 102.191,17.517 103.623,17.517 ; 105.664,83.947 110.873,83.947 ccw(c110.937,84.645) 111.635,84.582 111.635,91.313 ; 107.324,17.517 108.629,17.517 cw(c108.692,16.818) 109.391,16.882 109.391,10.151 ; 44.958,46.355 68.707,46.355 68.707,50.8 44.958,50.8 44.958,46.355
  text "GND" at 69.342,88.265 h1.2 r90
  text "A14" at 73.152,88.011 h1.2 r90
  text "A11" at 82.804,88.011 h1.2 r90
  text "B-" at 90.551,88.011 h1.2 r90
  text "A13" at 77.343,87.884 h1.2 r90
  text "A12" at 87.122,87.884 h1.2 r90
  text "A+" at 94.742,87.884 h1.2 r90
  text "CS" at 98.298,87.884 h1.2 r90
  text "MOSI" at 101.981,87.884 h1.2 r90
  text "SCK" at 106.045,87.884 h1.2 r90
  text "MOSI" at 109.982,87.884 h1.2 r90
  text "47" at 62.23,87.757 h1.2 r90
  text "35" at 65.913,87.757 h1.2 r90
  text "GND" at 50.546,87.63 h1.5 r90
  text "3V3" at 54.229,87.63 h1.5 r90
  text "5V" at 57.785,87.63 h1.5 r90
  text "ADC" at 78.486,83.312 h0.8
  text "RS485" at 90.424,83.312 h0.8
  text "SPI" at 102.87,83.312 h0.8
  text "GPIO" at 61.849,83.185 h0.8
  text "GND" at 165.154,70.685 h0.9 r90
  text "+5V" at 165.154,66.113 h0.9 r90
  text "120R" at 100.203,62.484 h1.52
  text "DC OUTPUT" at 163.127,62.049 h2 r90
  text "+9V" at 165.154,62.049 h0.9 r90
  text "+IN" at 165.154,53.413 h0.8 r90
  text "-IN" at 165.154,49.476 h0.8 r90
  text "SMART-IoT  2601" at 45.593,47.117 h3
  text "SUPPLY" at 163.127,47.061 h2 r90
  text "+IN" at 165.281,45.666 h0.8 r90
  text "+24V" at 165.154,36.522 h0.8 r90
  text "+12V" at 165.154,32.458 h0.8 r90
  text "DC OUTPUT" at 163.127,28.394 h2 r90
  text "GND" at 165.154,28.14 h0.9 r90
  text "I2C" at 48.006,17.526 h0.8
  text "GPIO" at 55.753,17.526 h0.8
  text "UART" at 71.882,17.526 h0.8
  text "GPIO" at 84.328,17.526 h0.8
  text "RELAY" at 93.98,17.526 h0.8
  text "I2C" at 104.648,17.526 h0.8
  text "SCL1" at 48.006,7.62 h1.2 r90
  text "SDA1" at 52.197,7.62 h1.2 r90
  text "46" at 55.88,7.62 h1.2 r90
  text "3" at 60.071,7.62 h1.2 r90
  text "3V3" at 63.754,7.62 h1.5 r90
  text "TX1" at 67.183,7.62 h1.2 r90
  text "TX2" at 71.12,7.62 h1.2 r90
  text "RX2" at 74.93,7.62 h1.2 r90
  text "RX1" at 80.899,7.62 h1.2 r90
  text "IO2" at 84.709,7.62 h1.2 r90
  text "IO1" at 88.519,7.62 h1.2 r90
  text "RLY3" at 92.456,7.62 h1.2 r90
  text "RLY2" at 96.266,7.62 h1.2 r90
  text "RLY1" at 99.822,7.62 h1.2 r90
  text "SDA2" at 103.886,7.62 h1.2 r90
  text "SCL2" at 107.95,7.62 h1.2 r90
Bottom Overlay:
  lines w0.254: 44.923,9.19 44.923,15.921 cw(c45.621,15.858) 45.685,16.556 46.735,16.556 ; 51.072,16.556 52.376,16.556 cw(c52.44,15.858) 53.138,15.921 53.138,9.19 ; 53.686,9.19 53.686,15.921 cw(c54.384,15.858) 54.448,16.556 ; 59.403,91.081 59.403,84.35 ccw(c60.102,84.414) 60.165,83.715 61.308,83.715 ; 59.996,16.556 cw(c60.06,15.858) 60.758,15.921 60.758,9.19 ; 64.862,9.19 64.862,15.921 cw(c65.56,15.858) 65.624,16.556 70.484,16.556 ; 64.864,83.715 65.896,83.715 ccw(c65.96,84.414) 66.658,84.35 66.658,91.081 ; 70.436,91.208 70.436,84.477 ccw(c71.135,84.541) 71.198,83.842 76.421,83.842 ; 76.091,16.683 80.443,16.683 cw(c80.507,15.985) 81.205,16.048 81.205,9.317 ; 81.628,83.842 86.851,83.842 ccw(c86.915,84.541) 87.613,84.477 87.613,91.208 ; 82.007,9.317 82.007,16.048 cw(c82.705,15.985) 82.769,16.683 83.565,16.683 ; 87.902,16.556 88.574,16.556 cw(c88.637,15.858) 89.336,15.921 89.336,9.19 ; 88.343,91.208 88.343,84.477 ccw(c89.042,84.541) 89.105,83.842 ; 90.008,9.19 90.008,15.921 cw(c90.706,15.858) 90.77,16.556 92.963,16.556 ; 94.725,83.842 ccw(c94.789,84.541) 95.487,84.477 95.487,91.208 ; 96.344,91.208 96.344,84.477 ccw(c97.043,84.541) 97.106,83.842 101.567,83.842 ; 98.443,16.683 100.026,16.683 cw(c100.089,15.985) 100.788,16.048 100.788,9.317 ; 101.438,9.317 101.438,16.048 cw(c102.136,15.985) 102.2,16.683 103.631,16.683 ; 105.504,83.842 110.714,83.842 ccw(c110.777,84.541) 111.476,84.477 111.476,91.208 ; 107.333,16.556 108.637,16.556 cw(c108.701,15.858) 109.399,15.921 109.399,9.19
  text "SCK" at 106.172,94.234 h1.2 r90
  text "GND" at 50.102,93.934 h1.5 r90
  text "3V3" at 53.912,93.934 h1.5 r90
  text "5V" at 57.722,93.934 h1.5 r90
  text "47" at 61.561,93.934 h1.2 r90
  text "35" at 65.346,93.934 h1.2 r90
  text "GND" at 69.156,93.934 h1.2 r90
  text "A14" at 72.979,93.934 h1.2 r90
  text "A13" at 76.776,93.934 h1.2 r90
  text "A11" at 82.885,93.934 h1.2 r90
  text "A12" at 86.695,93.934 h1.2 r90
  text "B-" at 90.505,93.934 h1.2 r90
  text "A+" at 94.315,93.934 h1.2 r90
  text "CS" at 98.239,93.934 h1.2 r90
  text "MOSI" at 102.049,93.934 h1.2 r90
  text "MOSI" at 109.415,93.934 h1.2 r90
  text "ADC" at 80.645,83.185 h0.8
  text "RS485" at 93.98,83.185 h0.8
  text "SPI" at 104.648,83.185 h0.8
  text "GPIO" at 64.516,83.058 h0.8
  text "GND" at 167.821,72.825 h0.9 r90
  text "DC OUTPUT" at 165.159,72.317 h2 r90
  text "+5V" at 167.821,68.888 h0.9 r90
  text "+9V" at 167.821,65.078 h0.9 r90
  text "+IN" at 168.329,55.68 h0.8 r90
  text "SUPPLY" at 165.286,54.031 h2 r90
  text "-IN" at 168.329,51.743 h0.8 r90
  text "+IN" at 168.329,47.552 h0.8 r90
  text "+24V" at 167.821,39.043 h0.8 r90
  text "DC OUTPUT" at 165.286,38.662 h2 r90
  text "+12V" at 167.821,34.852 h0.8 r90
  text "GND" at 167.821,30.661 h0.9 r90
  text "RELAY" at 97.282,16.764 h0.8
  text "UART" at 74.549,16.637 h0.8
  text "GPIO" at 87.249,16.637 h0.8
  text "I2C" at 106.553,16.637 h0.8
  text "I2C" at 49.784,16.51 h0.8
  text "GPIO" at 58.547,16.51 h0.8
  text "SDA2" at 103.446,8.844 h1.2 r90
  text "SCL2" at 107.51,8.725 h1.2 r90
  text "SDA1" at 51.892,8.703 h1.2 r90
  text "RLY3" at 92.016,8.697 h1.2 r90
  text "RLY2" at 95.975,8.69 h1.2 r90
  text "SCL1" at 47.701,8.584 h1.2 r90
  text "RLY1" at 99.649,8.549 h1.2 r90
  text "3V3" at 63.437,8.416 h1.5 r90
  text "RX2" at 74.639,8.093 h1.2 r90
  text "TX2" at 70.829,8.033 h1.2 r90
  text "RX1" at 80.726,7.952 h1.2 r90
  text "TX1" at 66.892,7.892 h1.2 r90
  text "IO2" at 84.404,7.72 h1.2 r90
  text "IO1" at 88.214,7.579 h1.2 r90
  text "46" at 55.575,7.279 h1.2 r90
  text "3" at 59.529,6.648 h1.2 r90
Top Solder:
  rectangle: 29.72,99.187 32.36,100.203
  rectangle: 172.974,7.366 174.117,92.837
  rectangle: 166.624,7.366 174.117,17.907
  rectangle: 19.431,0 169.164,0.889
  rectangle: 41.402,99.23 169.173,100.203
  rectangle: 166.624,0 169.164,17.907
  rectangle: 165.989,80.518 174.117,92.837
  rectangle: 165.989,82.169 169.164,100.33
  rectangle: 0,90.043 8.255,92.837
  rectangle: 0,7.366 9.144,8.89
  rectangle: 7.352,0 9.144,7.949
  rectangle: 0.127,7.366 6.858,17.399
  rectangle: 0,81.534 6.858,92.837
  rectangle: 7.366,90.043 8.255,100.33
  region: 0,92.837 4.001,92.837 3.937,7.366 0,7.366
Bottom Solder:
  rectangle: 172.974,7.366 174.117,92.837
  rectangle: 166.624,7.366 174.117,17.95
  rectangle: 165.989,80.518 174.117,92.837
  rectangle: 166.624,0 169.164,17.95
  rectangle: 165.989,82.169 169.173,100.33
  rectangle: 7.366,0 169.164,0.889
  rectangle: 7.366,99.23 169.173,100.203
  rectangle: 7.366,0 9.271,8.89
  rectangle: 0,7.366 9.144,8.89
  rectangle: 0,7.366 6.858,17.399
  rectangle: 0,7.366 4.127,92.837
  rectangle: 0,81.534 6.858,92.837
  rectangle: 0,90.043 8.255,92.837
  rectangle: 7.366,90.043 8.255,100.33